# Altium PCB NC_PCB_4L.PcbDoc (part 1 of 2)
Units mm, origin at the board's own origin, x right, y up, seen from the top; angles counter-clockwise.
Board outline 25 x 37 mm, 4 copper layers (Top, GND, PWR, Bottom), stack 1.591 mm thick; 63 components, 32 nets, 228 pads, 73 vias.
Unrouted connection lines stored in the file: 49.
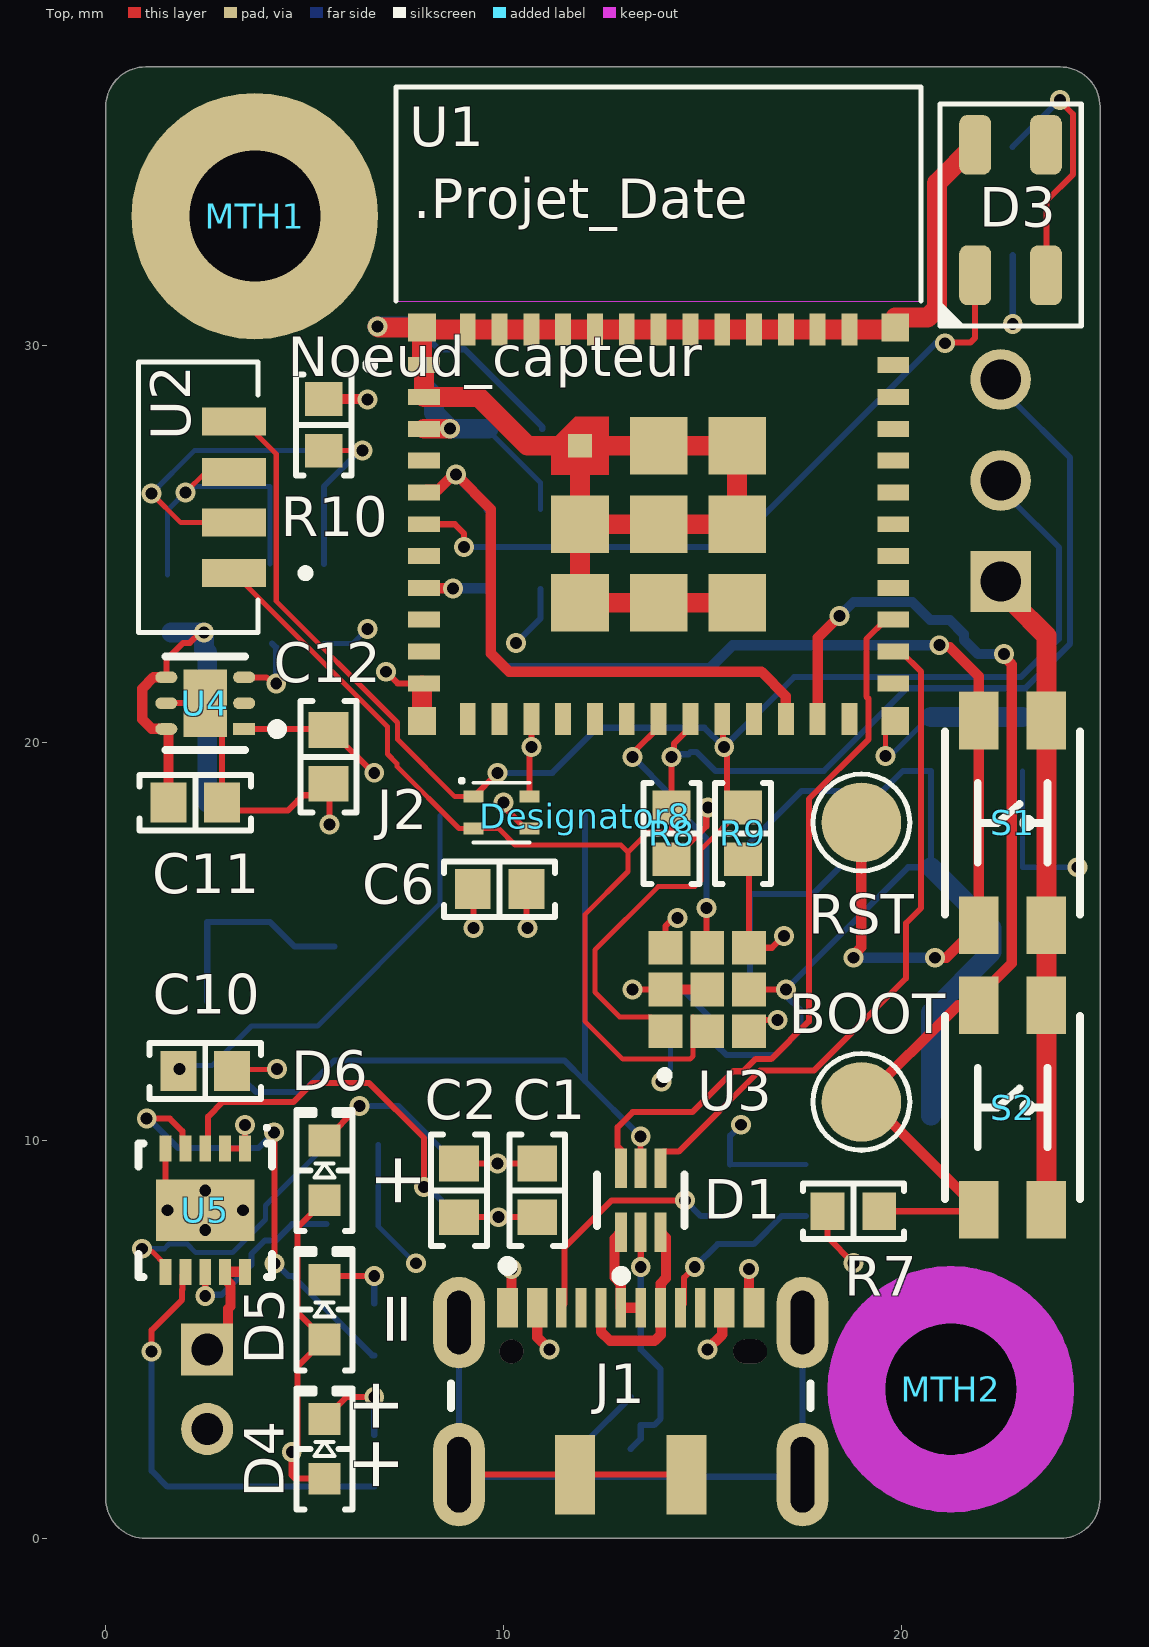
[diagram p0: Top view]
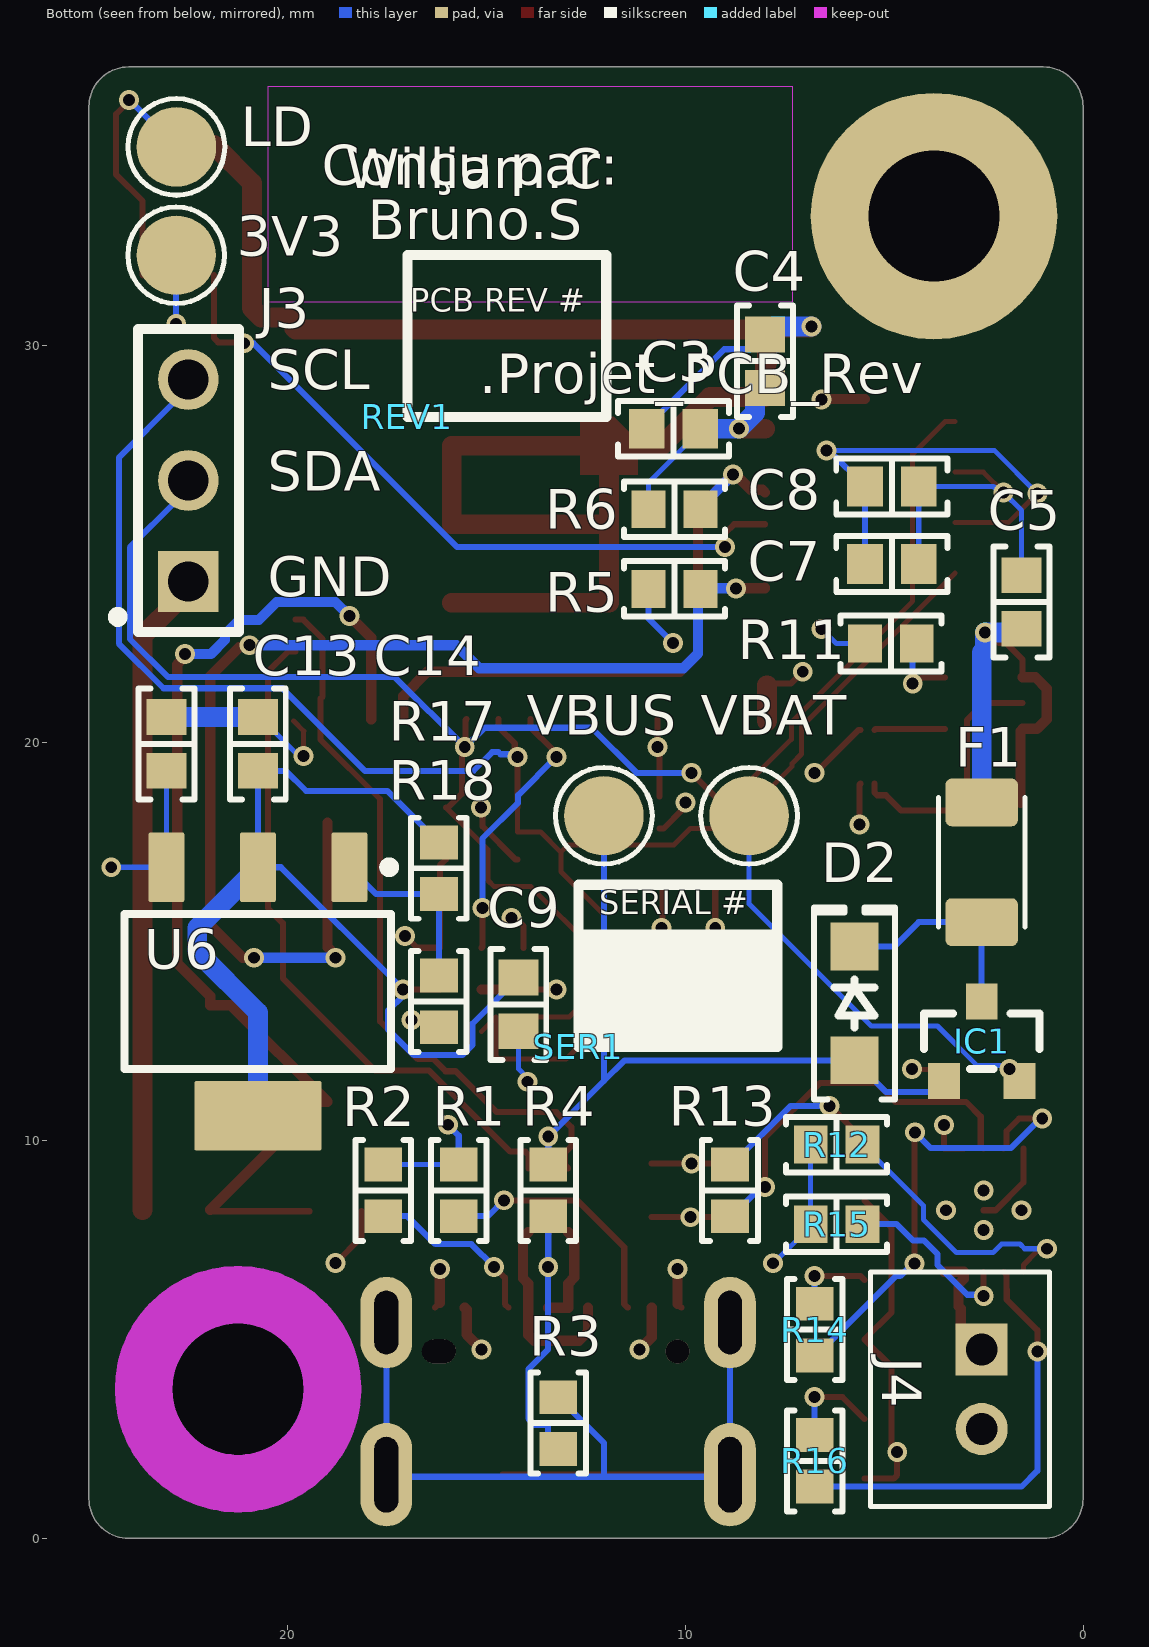
[diagram p1: Bottom view, seen from below]
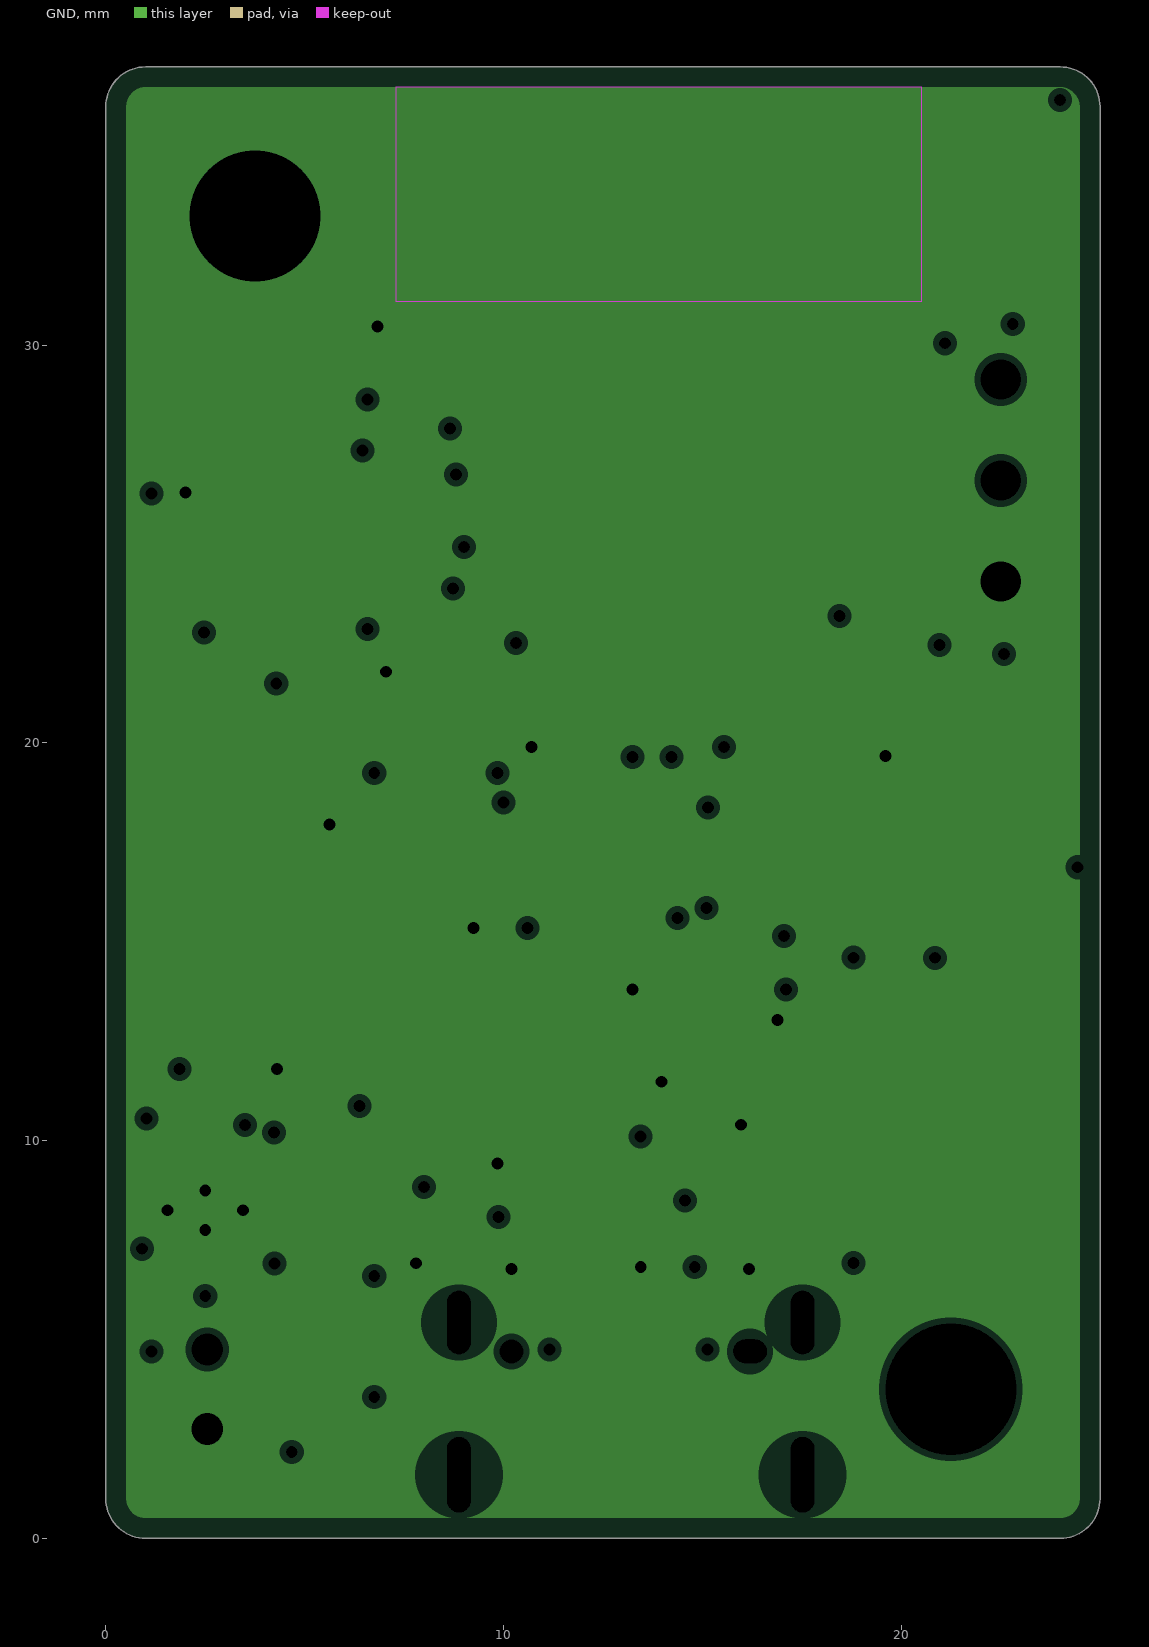
[diagram p2: GND, clearances drawn from the general rule]
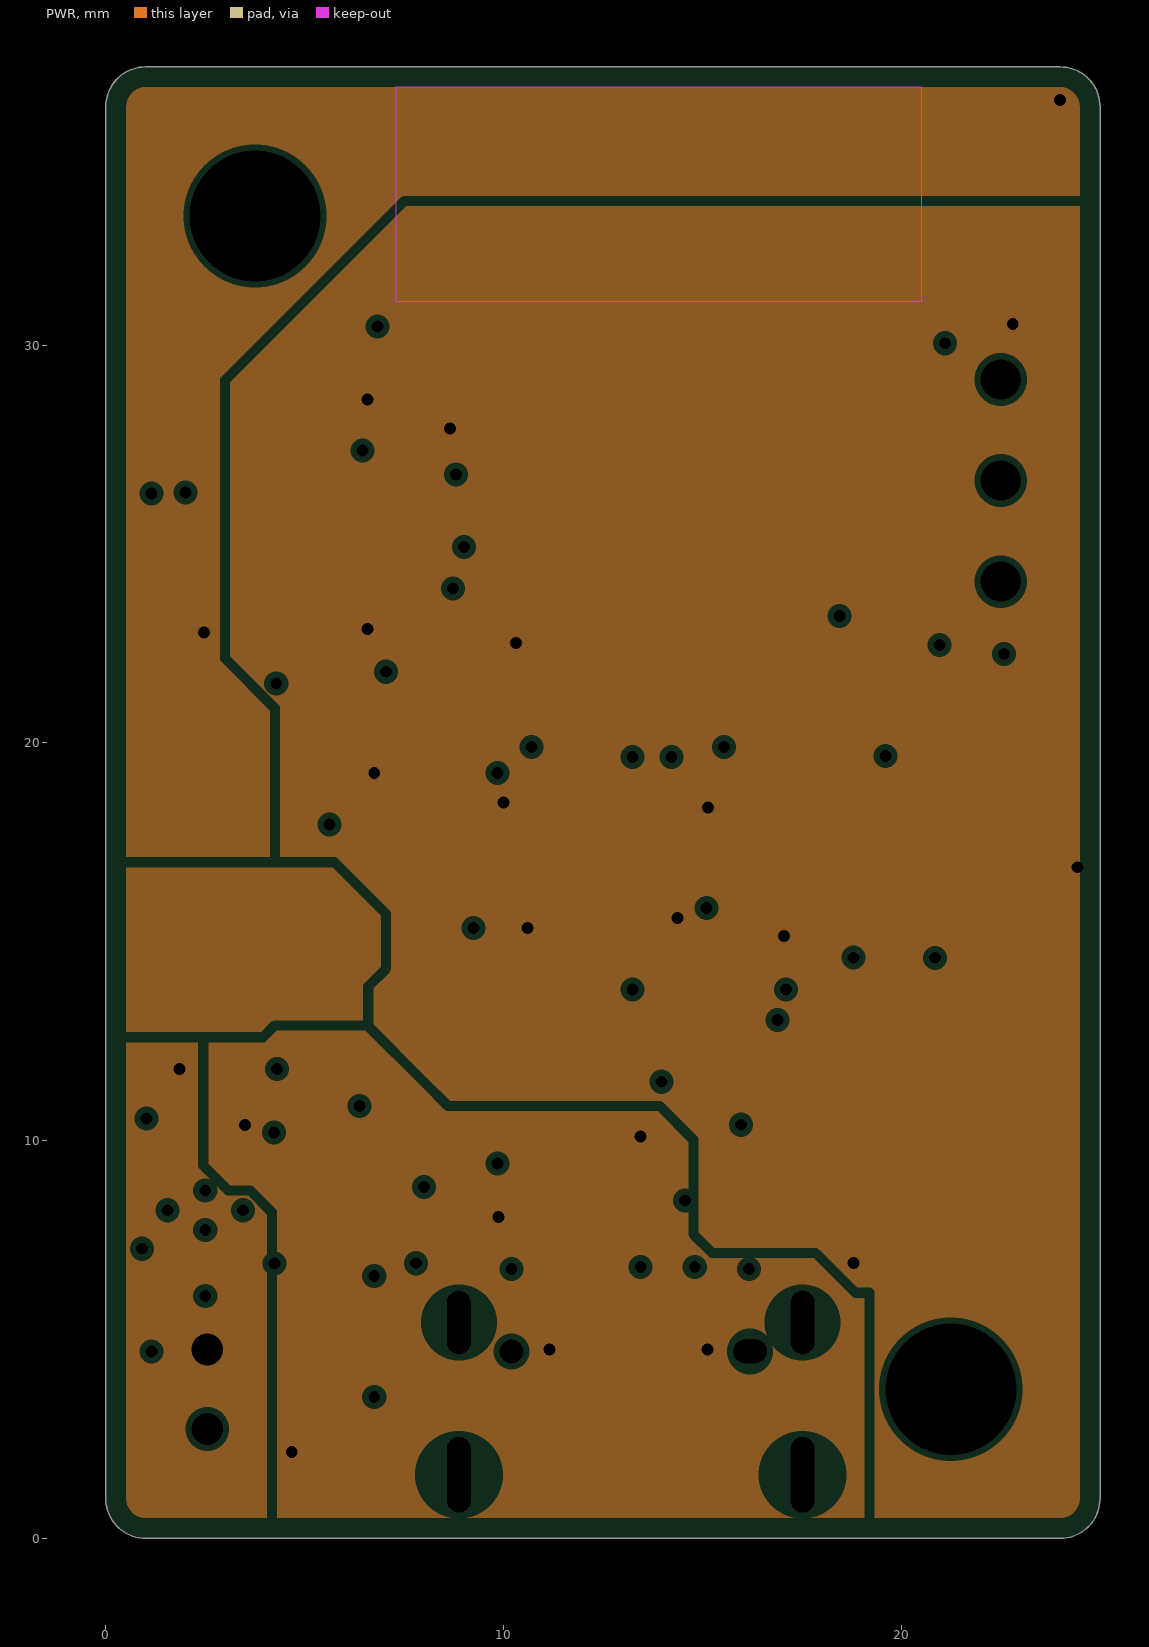
[diagram p3: PWR, clearances drawn from the general rule]
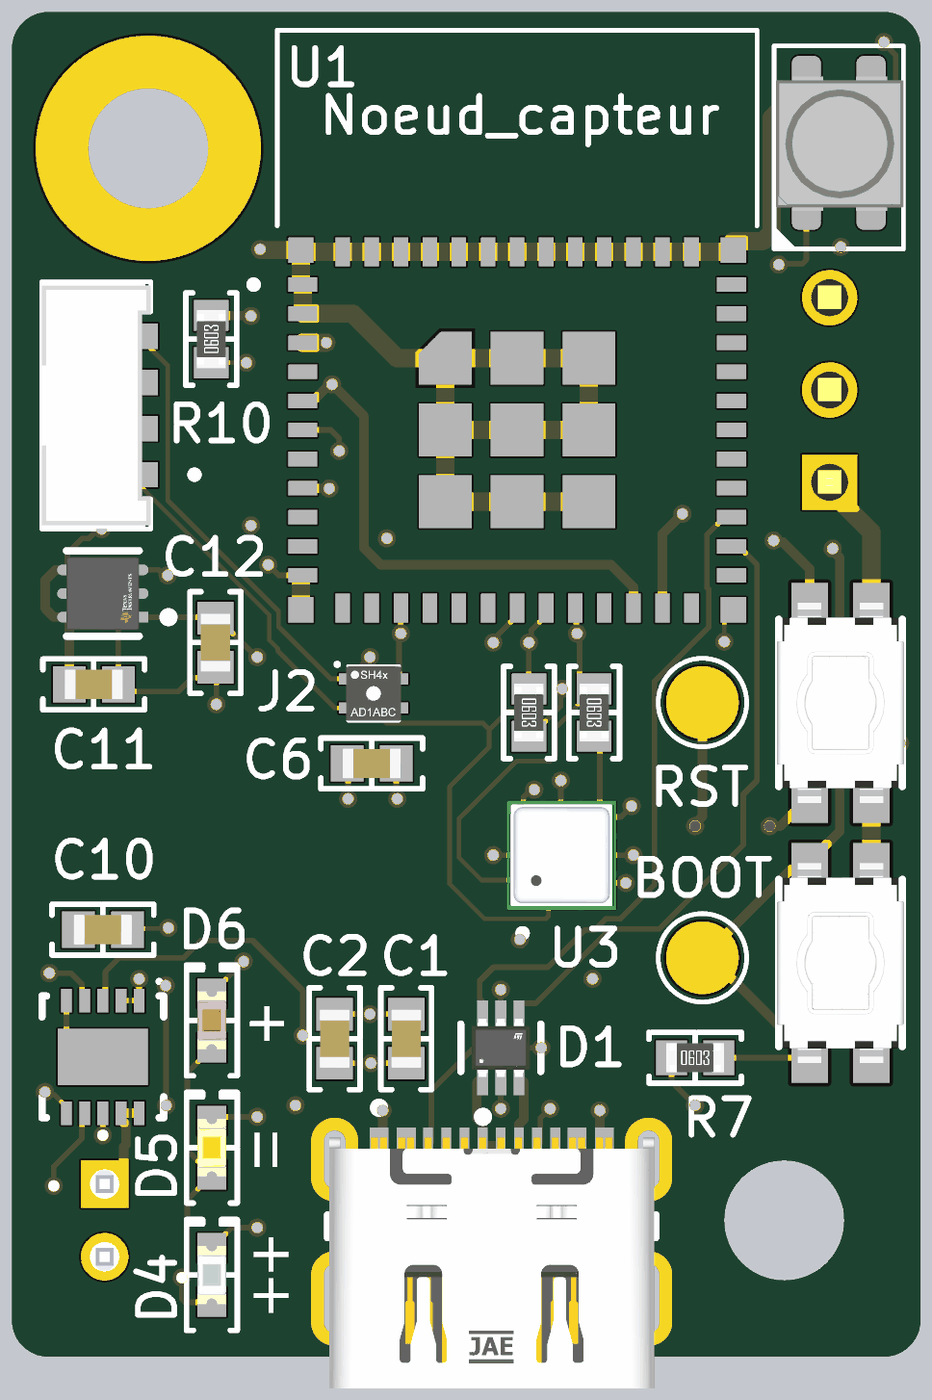
[diagram p4: 3D render of the assembled board from above, using the file's embedded part models]
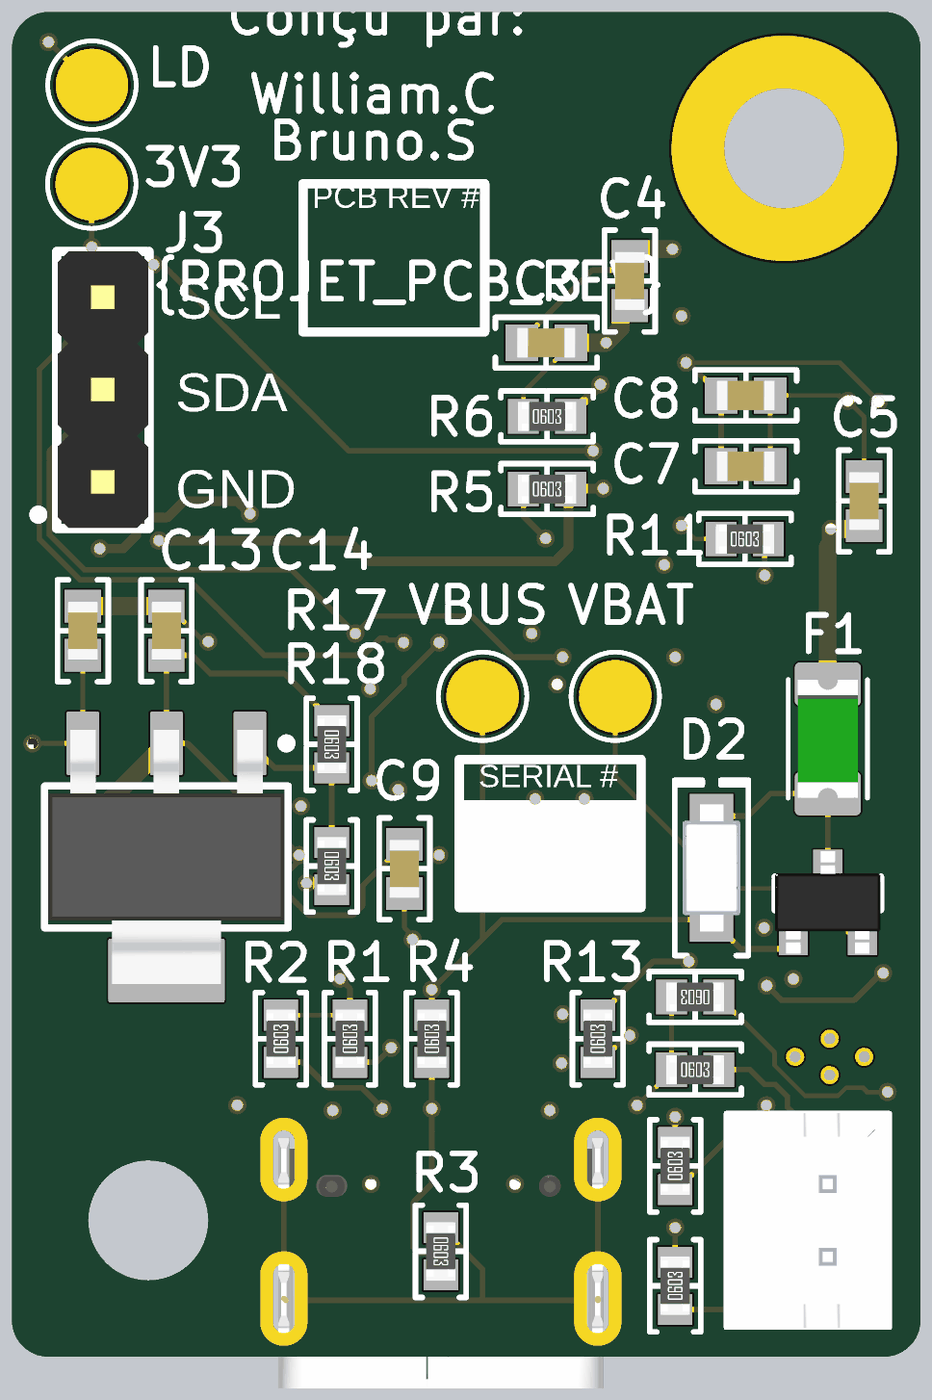
[diagram p5: 3D render of the assembled board from below, using the file's embedded part models]

## Layer stack, top to bottom
Top Solder: solder mask 0.0102, Solder Resist, Dk 3.5
Top: signal copper 0.035
Dielectric 1: prepreg 0.2104, 7628, Dk 4.1
GND: plane copper 0.0175, net GND
Dielectric 2: core 1.065, Dk 4.6
PWR: plane copper 0.0175, net (Multiple Nets)
Dielectric 3: prepreg 0.2104, 7628, Dk 4.6
Bottom: signal copper 0.035
Bottom Solder: solder mask 0.0102, Solder Resist, Dk 3.5

## Board outline
0,1 0,36 cw(c1,36) 1,37 24,37 cw(c24,36) 25,36 25,1 cw(c24,1) 24,0 1,0 cw(c1,1)

## Design rules (kind name [scope] priority, off if disabled: settings)
BoardOutlineClearance [All] p1: gap=0.2 ignorepadtopadclearanceinfootprint=FALSE except(0: Arc-SplitContinuation Track-SplitContinuation SMDPad-SplitContinuation THPad-SplitContinuation Via-SplitContinuation Fill-SplitContinuation Poly-SplitContinuation Region-SplitContinuation Text-SplitContinuation)
Clearance "Schematic Clearance Constraint_1" [InComponent('SER1')] p1: gap=0.254 ignorepadtopadclearanceinfootprint=FALSE except(0: Arc-Text Track-Text Text-Text)
Clearance "Schematic Clearance Constraint" [InComponent('REV1')] p2: gap=0.254 ignorepadtopadclearanceinfootprint=FALSE except(0: Arc-Text Track-Text Text-Text)
Clearance [All] p3: gap=0.152 ignorepadtopadclearanceinfootprint=FALSE except(0.127: Arc-Arc Arc-Track Arc-Hole Track-Track Track-Hole SMDPad-Fill SMDPad-Poly SMDPad-Region SMDPad-Hole THPad-Hole Via-Hole Fill-Hole Poly-Hole Region-Hole Text-Hole; 0.2: Arc-SMDPad Track-SMDPad; 0.254: Arc-Via Track-Via Via-Via; 0.33: Arc-THPad Track-THPad; 0.5: THPad-THPad)
ComponentClearance "Schematic Component Clearance Constraint_1" [InComponent('SER1')] p1: gap=0 collisioncheckmode=3 verticalgap=0 showdistances=FALSE
ComponentClearance "Schematic Component Clearance Constraint" [InComponent('REV1')] p2: gap=0 collisioncheckmode=3 verticalgap=0 showdistances=FALSE
ComponentClearance [All] p3: gap=0.102 collisioncheckmode=3 verticalgap=0.102 showdistances=FALSE
DiffPairsRouting [All] p1: maxlimit=0.254 minlimit=0.254 mostfreqgap=0.254 toplayer_minwidth=0.26 toplayer_maxwidth=0.381 toplayer_prefwidth=0.381 bottomlayer_minwidth=0.26 bottomlayer_maxwidth=0.381 bottomlayer_prefwidth=0.381 maxuncoupledlength=12.7
HoleSize [All] p1: absolutevalues=TRUE maxlimit=6.3 minlimit=0.3 maxpercent=80.000 minpercent=20.000
HoleToHoleClearance [All] p1: gap=0.45 allowstackedmicrovias=FALSE
MinimumAnnularRing [All] p1: minimumring=0.1
MinimumSolderMaskSliver [All] p1: minsoldermaskwidth=0.1
PlaneClearance [All] p1: clearance=0.152
PlaneConnect [All] p1: pad.planeconnectstyle=Relief pad.reliefexpansion=0.508 pad.reliefentries=4 pad.reliefconductorwidth=0.254 pad.reliefairgap=0.254 via.planeconnectstyle=Direct via.reliefexpansion=0.508 via.reliefentries=4 via.reliefconductorwidth=0.254 via.reliefairgap=0.254
PolygonConnect [All] p1: thpad.connectstyle=Relief thpad.reliefconductorwidth=0.254 thpad.reliefentries=4 thpad.polygonreliefangle="90 Angle" thpad.airgapwidth=0.254 smdpad.connectstyle=Relief smdpad.reliefconductorwidth=0.254 smdpad.reliefentries=4 smdpad.polygonreliefangle="90 Angle" smdpad.airgapwidth=0.254 via.connectstyle=Direct via.reliefconductorwidth=0.254 via.reliefentries=4 via.polygonreliefangle="90 Angle" via.airgapwidth=0.254
RoutingVias [All] p1: holewidth=0.3 width=0.5 viastyle="Through Hole" minholewidth=0.3 minwidth=0.5 maxholewidth=6.3 maxwidth=6.5
SilkToSilkClearance [All] p1: silktosilkclearance=0.102
SilkToSolderMaskClearance [IsPad] p1: minsilkscreentomaskgap=0.024 clearancetoexposedcopper=FALSE
SolderMaskExpansion SolderMaskExpansion_Via [isVia] p1: expansion=0.102 istentingtop=TRUE
SolderMaskExpansion [All] p2: expansion=0.051 istentingtop=FALSE
SupplyNets "Schematic Supply Nets_9" [InNet('VBAT')] p1: voltage=0.000
SupplyNets "Schematic Supply Nets_8" [InNet('3V3')] p2: voltage=0.000
SupplyNets "Schematic Supply Nets_7" [InNet('VBUS')] p3: voltage=0.000
SupplyNets "Schematic Supply Nets_6" [InNet('GND')] p4: voltage=0.000
SupplyNets "Schematic Supply Nets_2" [InNet('LOAD')] p5: voltage=0.000
SupplyNets "Schematic Supply Nets" [InNet('1V8')] p6: voltage=0.000
Width [All] p1: maxlimit=25.4 minlimit=0.127 preferedwidth=0.152 minimp=50.000000 maximp=50.000000 favimp=50.000000
21 further rules are at their usual default settings.

## Classes and differential pairs
component class NC_Connectors: C1 C2 C? D1 D2 F1 IC1 J1 MTH1 MTH2 R1 R2 R3 R4 R? VBUS
component class NC_Circuit: BOOT C3 C4 C5 C6 C7 C8 C9 C? D3 J2 J3 R5 R6 R7 R8 R9 R10 R? RST S1 S2 S? U1 U2 U3
component class NC_Alimentation: 3V3 C10 C11 C12 C13 C14 C? D4 D5 D6 g J4 LOAD R11 R12 R13 R14 R15 R16 R17 R18 R? U4 U6 VBAT
component class NC_Title: REV1 SER1

## Components (designator, comment, footprint, x,y, rotation, side; value= is the part's Value field where it differs from the comment)
3V3 "TPO_SMD_ROUND_2MM" TPO_SMD_ROUND_2MM 22.805,32.264 r180 bottom (schematic designator TP6)
BOOT "TPO_SMD_ROUND_2MM" TPO_SMD_ROUND_2MM 19,10.975 r0 top (schematic designator TP4)
C1 "1µF" "CAP 0603_1608" 10.85,8.75 r270 top
C2 "1µF" "CAP 0603_1608" 8.88,8.75 r270 top
C3 "10 µF" "CAP 0603_1608" 10.3,27.9 r180 bottom
C4 "0.1 µF" "CAP 0603_1608" 8,29.6 r270 bottom
C5 "1µF" "CAP 0603_1608" 1.55,23.545 r270 bottom
C6 "1µF" "CAP 0603_1608" 9.9,16.325 r0 top
C7 "1µF" "CAP 0603_1608" 4.808,24.5 r0 bottom
C8 "1µF" "CAP 0603_1608" 4.808,26.45 r0 bottom
C9 "1µF" "CAP 0603_1608" 14.2,13.425 r90 bottom
C10 "10 µF" "CAP 0603_1608" 2.5,11.75 r180 top
C11 "1 µF" "CAP 0603_1608" 2.25,18.5 r180 top
C12 "1 µF" "CAP 0603_1608" 5.6,19.65 r90 top
C13 "0.1 µF" "CAP 0603_1608" 23.05,19.975 r270 bottom
C14 "10 µF" "CAP 0603_1608" 20.75,19.975 r270 bottom
D1 "USBLC6-2P6" FP-SOT-666-MFG 13.45,8.5 r90 top
D2 "MBR1H100SFT3G" SOD123F 5.75,13.45 r90 bottom
D3 "Neopixel_3535" Neopixel_3535-Footprint-1 22.75,33.401 r270 top
D4 "Green" "LED 0603_1608 GREEN" 5.5,2.25 r90 top
D5 "Yellow" "LED 0603_1608 YELLOW" 5.5,5.75 r90 top
D6 "Red" "LED 0603_1608 RED" 5.5,9.25 r90 top
Designator8 "Comment" STN_STENCIL_TOP_LPKFS4_210x297 12.05,18.17 r0 top
F1 "PTC_1.8A_1206" RESC3216X125N 2.55,17 r270 bottom
IC1 "DMG3415U-7" "DIODES SOT-23-3" 2.55,12.5 r90 bottom
J1 "DX07S016JA1R1500" FP-DX07S016JA1R1500-MFG 13.2,2.6 r0 top
J2 "SHT41-AD1B-R2" SHT4X 9.95,18.25 r0 top
J3 "CON_HDR_1X3" CON_HDR_1x3 22.5,26.6 r0 bottom
J4 "B2B-PH-K-S" JST_B2B-PH-K-S 3.1,3.75 r90 bottom
LD "TPO_SMD_ROUND_2MM" TPO_SMD_ROUND_2MM 22.8,34.989 r180 bottom (schematic designator TP5)
MTH1 "MTH_M3" MTH_M3 3.75,33.25 r0 top
MTH2 "MTH_M3_NON_PLATED" MTH_M3_NON_PLATED 21.25,3.75 r0 top
R1 "5.1k Ohms" "RES 0603_1608" 15.7,8.75 r90 bottom
R2 "5.1k Ohms" "RES 0603_1608" 17.6,8.75 r90 bottom
R3 "0 Ohms" "RES 0603_1608" 13.2,2.9 r270 bottom
R4 "100K Ohms" "RES 0603_1608" 13.45,8.75 r90 bottom
R5 "10k Ohms" "RES 0603_1608" 10.275,23.875 r180 bottom
R6 "10k Ohms" "RES 0603_1608" 10.275,25.875 r180 bottom
R7 "10k Ohms" "RES 0603_1608" 18.8,8.225 r0 top
R8 "4.7K Ohms" "RES 0603_1608" 14.225,17.725 r270 top
R9 "4.7K Ohms" "RES 0603_1608" 16.022,17.725 r270 top
R10 "10 Ohms" "RES 0603_1608" 5.483,28 r90 top
R11 "10k Ohms" "RES 0603_1608" 4.833,22.5 r180 bottom
R12 "1k Ohms" "RES 0603_1608" 6.2,9.9 r0 bottom
R13 "470 Ohms" "RES 0603_1608" 8.88,8.75 r90 bottom
R14 "470 Ohms" "RES 0603_1608" 6.75,5.25 r90 bottom
R15 "10k Ohms" "RES 0603_1608" 6.2,7.9 r180 bottom
R16 "470 Ohms" "RES 0603_1608" 6.75,1.95 r90 bottom
R17 "150 Ohms" "RES 0603_1608" 16.2,16.85 r270 bottom
R18 "75 Ohms" "RES 0603_1608" 16.2,13.5 r270 bottom
REV1 "Revision Cartridge Mini" REV_REVISION_CARTRIDGE_MINI 16.991,28.2 r180 bottom
RST "TPO_SMD_ROUND_2MM" TPO_SMD_ROUND_2MM 19,18 r0 top (schematic designator TP3)
S1 "EVQ-P2202M" "PANASONIC EVQP2" 22.8,17.99 r270 top
S2 "EVQ-P2202M" "PANASONIC EVQP2" 22.8,10.834 r270 top
SER1 "Serial Cartridge MICRO" SER_SERIAL_CARTRIDGE_MICRO 12.692,12.359 r180 bottom
U1 "ESP32-C3-MINI-1-N4" XCVR_ESP32-C3-MINI-1-N4 13.9,28.2 r0 top
U2 "VEML7700-TT" XDCR_VEML7700-TT 2.322,26.175 r180 top
U3 "ENS160-BGLM" XDCR_ENS160-BGLM 15.125,13.8 r90 top
U4 "LP5912-3.3DRVT" FP-DRV0006A-IPC_C 2.5,21 r180 top
U5 "MCP73833T-FCI/MF" DFN-MF10 2.5,8.25 r270 top
U6 "LM1117MPX-ADJ/NOPB" DCY0004A_N 20.75,13.75 r270 bottom
VBAT "TPO_SMD_ROUND_2MM" TPO_SMD_ROUND_2MM 8.4,18.17 r180 bottom (schematic designator TP9)
VBUS "TPO_SMD_ROUND_2MM" TPO_SMD_ROUND_2MM 12.05,18.17 r180 bottom (schematic designator TP1)

## Footprints (in the part's own frame and the unit in brackets; to place one, negate y for a bottom-side part, rotate by r counter-clockwise, add the part's x,y. Pads: shape width x height; smd on the part's side, far side on the other; paste and mask are expansions set on the pad)
"CAP 0603_1608" [mm] "Chip Capacitor, 2-Leads, Body 1.60x0.80mm, IPC Medium Density"
  rect 0.9x1 smd: 1(-0.675,0) 2(0.675,0)
  silkscreen extent -1.4,-0.7 1.4,0.7, body extent -0.8,-0.41 0.8,0.41, height 0.82
CON_HDR_1x3 [mil]
  rect 60x60 hole 40: 1(0,100)
  round 60 hole 40: 2(0,0) 3(0,-100)
  silkscreen extent -50,-150 75,150, body extent -49,-150 49,150, height 338
DCY0004A_N [mm] "SOT223, 4-Leads, Body 6.7x3.7mm, Pitch 2.3mm, IPC Medium Density"
  rrect11% 1.75x0.9 smd: 1(-3.125,2.3) 2(-3.125,0) 3(-3.125,-2.3)
  rrect6% 1.75x3.2 smd: 4(3.125,0)
  silkscreen extent -3.25,-3.35 1.95,3.42, body extent -3.5,-3.25 3.5,3.25, height 1.62
DFN-MF10 [mm] "SON, 10-Leads, Body 3x3mm, Pitch 0.5mm, Microchip Recommended"
  rect 0.65x0.3 smd: 1(-1.55,1) 2(-1.55,0.5) 3(-1.55,0) 4(-1.55,-0.5) 5(-1.55,-1) 6(1.55,-1) 7(1.55,-0.5) 8(1.55,0) 9(1.55,0.5) 10(1.55,1)
  rect 1.55x2.48 smd: 11(0,0)
  silkscreen extent -2.12,-1.68 1.68,1.68, body extent -1.52,-1.52 1.52,1.52, height 1
"DIODES SOT-23-3" [mm] "SOT23, 3-Leads, Body 2.90x2.40mm, Pitch 0.95mm, IPC Medium Density"
  rect 0.9x0.8 smd: 1(-1,0.95) 2(-1,-0.95) 3(1,0)
  silkscreen extent -0.7,-1.45 0.7,1.45, body extent -1.41,-1.45 1.41,1.45, height 1.5
FP-DRV0006A-IPC_C [mm]
  rect 0.556x0.292 smd paste+0 mask+0: 1(-0.978,0.65)
  rrect100% 0.556x0.292 smd paste+0 mask+0: 2(-0.978,0) 3(-0.978,-0.65) 4(0.978,-0.65) 5(0.978,0) 6(0.978,0.65)
  rect 1.1x1.7 smd paste-1000 mask+0: 7(0,0)
  silkscreen extent -1.93,-1.18 1,1.18, body extent -1,-1 1,1, height 0.8
FP-DX07S016JA1R1500-MFG [mm]
  rrect100% 1.3x2.3 hole 1.6 slot 0.6 at 0 deg paste-2539.97 mask+0: 1(-4.32,2.825) 2(4.32,2.825)
  rrect100% 1.3x2.6 hole 1.9 slot 0.6 at 0 deg paste-2539.97 mask+0: 3(-4.32,-1) 6(4.32,-1)
  rect 1x2 smd paste+0 mask+0: 4(-1.4,-1) 5(1.4,-1)
  rect 0.52x1 smd paste+0 mask+0: A1/B12(-3.1,3.2) A4/B9(-2.35,3.2) A12/B1(3.1,3.2) B4/A9(2.35,3.2)
  rect 0.27x1 smd paste+0 mask+0: A5(-1.75,3.2) A6(-0.25,3.2) A7(0.75,3.2) A8(1.75,3.2) B5(1.25,3.2) B6(0.25,3.2) B7(-0.75,3.2) B8(-1.25,3.2)
  round 0.6 hole 0.6 unplated paste-2539.97 mask+0: ""(-3,2.1)
  rrect100% 0.85x0.6 hole 0.6 slot 0.85 at 0 deg unplated paste-2539.97 mask+0: ""(3,2.1)
  silkscreen extent -4.52,0.68 4.52,4.37, body extent -5.07,-3.75 5.07,4.08, height 0.25
FP-SOT-666-MFG [mm]
  rect 0.99x0.3 smd paste+0 mask+0: 1(-0.805,0.5) 2(-0.805,0) 3(-0.805,-0.5) 4(0.805,-0.5) 5(0.805,0) 6(0.805,0.5)
  silkscreen extent -2.02,-1.1 0.65,1.1, body extent -1.4,-0.95 1.4,0.95, height 0.25
JST_B2B-PH-K-S [mm]
  rect 1.308x1.308 / inner round 1.308 / far side rect 1.308x1.308 hole 0.8: 1(1,-0.55)
  round 1.308 hole 0.8: 2(-1,-0.55)
  silkscreen extent -2.95,-2.25 2.95,2.25, body extent -2.95,-2.25 2.95,2.25, height 6
"LED 0603_1608 GREEN" [mm] "Chip Diode, 2-Leads, Body 1.60x0.80mm, IPC Medium Density"
  rect 0.8x0.8 smd: 1(-0.75,0) 2(0.75,0)
  silkscreen extent -1.52,-0.7 1.52,0.7, body extent -0.8,-0.4 0.8,0.4, height 0.53
"LED 0603_1608 RED" [mm] "Chip Diode, 2-Leads, Body 1.60x0.80mm, IPC Medium Density"
  rect 0.8x0.8 smd: 1(-0.75,0) 2(0.75,0)
  silkscreen extent -1.52,-0.7 1.52,0.7, body extent -0.8,-0.4 0.8,0.4, height 0.53
"LED 0603_1608 YELLOW" [mm] "Chip Diode, 2-Leads, Body 1.60x0.80mm, IPC Medium Density"
  rect 0.8x0.8 smd: 1(-0.75,0) 2(0.75,0)
  silkscreen extent -1.52,-0.7 1.52,0.7, body extent -0.8,-0.4 0.8,0.4, height 0.53
MTH_M3 [mm] "Mounting Hole Metric M3"
  round 6.2 hole 3.3 paste-2539.97 mask+0.07: 1(0,0)
MTH_M3_NON_PLATED [mm] "Mounting Hole Metric M3 NON_PLATED"
  round 0 hole 3.3 unplated paste-2539.97 mask+0.07: 1(0,0)
  Top keep-out circle w1.45: c0,0 r2.375
  Bottom keep-out circle w1.45: c0,0 r2.375
Neopixel_3535-Footprint-1 [mm]
  rrect50% 1.5x0.8 smd: 1(-1.64,0.89) 2(-1.64,-0.89) 3(1.64,-0.89) 4(1.64,0.89)
  silkscreen extent -2.67,-1.78 2.92,1.78, body extent -1.82,-1.72 1.88,1.78, height 0.95
"PANASONIC EVQP2" [mm] "T-Switch. 4-leads, body 4.7x3.5mm, Panasonic EVQ-P2202M"
  rect 1.45x1 smd mask+0.1: 1(-2.575,0.85) 2(2.575,0.85) 3(-2.575,-0.85) 4(2.575,-0.85)
  silkscreen extent -2.3,-1.7 2.3,1.7, body extent -2.75,-1.75 2.75,1.75, height 2.1
"RES 0603_1608" [mm] "Chip Resistor, 2-Leads, Body 1.60x0.80mm, IPC Medium Density"
  rect 0.85x0.95 smd: 1(-0.65,0) 2(0.65,0)
  silkscreen extent -1.27,-0.7 1.27,0.7, body extent -0.8,-0.4 0.8,0.4, height 0.45
RESC3216X125N [mm]
  rrect25% 1.2x1.82 smd: 1(-1.505,0) 2(1.505,0)
  silkscreen extent -1.63,-1.09 1.63,1.09, body extent -1.63,-0.82 1.63,0.82, height 0.86
REV_REVISION_CARTRIDGE_MINI [mm]
  silkscreen extent 0,0 5,4.08
SER_SERIAL_CARTRIDGE_MICRO [mm]
  silkscreen extent 0,0 5.02,4.08
SHT4X [mm]
  rect 0.5x0.3 smd: 1(-0.7,0.4) 2(-0.7,-0.4) 3(0.7,-0.4) 4(0.7,0.4)
  silkscreen extent -1.05,-0.75 0.7,0.85, body extent -0.75,-0.75 0.75,0.75, height 0.69
SOD123F [mm] "SODFL, 2-Leads, Body 1.60x3.50mm, IPC Medium Density"
  rect 1.2x1.2 smd: 1(-1.43,0) 2(1.43,0)
  silkscreen extent -2.41,-1.02 2.41,1.02, body extent -1.75,-0.8 1.75,0.8, height 1.1
STN_STENCIL_TOP_LPKFS4_210x297 [mm] "Paste Mask Stencil TOP - PROTOPRINT S4 210x297"
  body extent -110.84,-153.45 -108.84,-151.45
TPO_SMD_ROUND_2MM [mm] "Test Point - SMD ROUND PAD ONLY"
  round 2 smd paste-2 mask+0.07: 1(0,0)
  silkscreen extent -1.22,-1.22 1.22,1.22, body extent -0.9,-0.9 0.9,0.9
XCVR_ESP32-C3-MINI-1-N4 [mm]
  rect 0.8x0.4 smd: 1(-5.9,1.3) 2(-5.9,0.5) 3(-5.9,-0.3) 4(-5.9,-1.1) 5(-5.9,-1.9) 6(-5.9,-2.7) 7(-5.9,-3.5) 8(-5.9,-4.3) 9(-5.9,-5.1) 10(-5.9,-5.9) 11(-5.9,-6.7) 25(5.9,-6.7) 26(5.9,-5.9) 27(5.9,-5.1) 28(5.9,-4.3) 29(5.9,-3.5) 30(5.9,-2.7) 31(5.9,-1.9) 32(5.9,-1.1) 33(5.9,-0.3) 34(5.9,0.5) 35(5.9,1.3)
  rect 0.4x0.8 smd: 12(-4.8,-7.6) 13(-4,-7.6) 14(-3.2,-7.6) 15(-2.4,-7.6) 16(-1.6,-7.6) 17(-0.8,-7.6) 18(0,-7.6) 19(0.8,-7.6) 20(1.6,-7.6) 21(2.4,-7.6) 22(3.2,-7.6) 23(4,-7.6) 24(4.8,-7.6) 36(4.8,2.2) 37(4,2.2) 38(3.2,2.2) 39(2.4,2.2) 40(1.6,2.2) 41(0.8,2.2) 42(0,2.2) 43(-0.8,2.2) 44(-1.6,2.2) 45(-2.4,2.2) 46(-3.2,2.2) 47(-4,2.2) 48(-4.8,2.2)
  rect 0.6x0.6 smd paste-1 mask+0: 49_1(-1.975,-0.725)
  rect 1.45x1.45 smd: 49_2(0,-0.725) 49_3(1.975,-0.725) 49_4(1.975,-2.7) 49_5(1.975,-4.675) 49_6(0,-4.675) 49_7(-1.975,-4.675) 49_8(-1.975,-2.7) 49_9(0,-2.7)
  rect 0.7x0.7 smd: 50(5.95,2.25) 51(5.95,-7.65) 52(-5.95,-7.65) 53(-5.95,2.25)
  Top region: -1.25,-1.45 -2.7,-1.45 -2.7,-0.6 -2.1,0 -1.25,0
  Keep-Out Layer region: 6.6,2.9 -6.6,2.9 -6.6,8.3 6.6,8.3
  Keep-Out Layer region: 6.6,2.9 -6.6,2.9 -6.6,8.3 6.6,8.3
  silkscreen extent -7.35,1.2 6.6,8.3
XDCR_ENS160-BGLM [mm]
  rect 0.85x0.85 smd mask+0.05: 1(-1.05,1.05) 2(-1.05,0) 3(-1.05,-1.05) 4(0,-1.05) 5(1.05,-1.05) 6(1.05,0) 7(1.05,1.05) 8(0,1.05) 9(0,0)
  silkscreen extent -2.25,0.97 -2.05,1.17, body extent -1.5,-1.5 1.5,1.5, height 0.9
XDCR_VEML7700-TT [mm]
  rect 1.6x0.7 smd: 1(-0.9,1.905) 2(-0.9,0.635) 3(-0.9,-0.635) 4(-0.9,-1.905)
  silkscreen extent -2.8,-3.4 1.5,3.4, body extent -1.5,-3.4 1.5,3.4, height 1.35

## Part data
3V3 BOOT LD RST VBAT VBUS: library part CMP-007-000003-1, "TPO - TEST POINT ROUND SMD PAD ONLY  - 2 MM", Package="2 MM ROUND", Assembly Type=NONE, Component Type="Standard (No BOM)", Design Item ID=TPO_SMD_ROUND_2MM, Pin Count=1, Source=CEGEP_SHERBROOKE_TGE_LIBRARY.SchLib
C1 C5 C8 C9: library part 06035C105KAT2A, "CAP CER 1UF 50V X7R 0603", Capacitance=10µF, Device Package="0603 (1608 Metric)", manufacturer="AVX Corporation", Operating Temperature="-55°C ~ 125°C", Supplier Part Number 1=478-10073-1-ND, Temperature Coefficient=X7R, Tolerance=±10%, Voltage - Rated=50V, Applications="General Purpose", componentlink1description=Datasheet, componentlink1url=http://datasheets.avx.com/X7RDielectric.pdf, componentlink2description="DigiKey Link", componentlink2url=http://digikey.com/product-detail/en/avx-corporation/06035C105KAT2A/478-10073-1-ND/6564295, lastupdated="2020-09-02 1:03:35 AM", Lifecycle Status=Active, Minimum Order=1, Mounting Type="Surface Mount, MLCC", Package / Case="0603 (1608 Metric)", packaging=TapeAndReel, Part Number=06035C105KAT2A, Part Status=Active, partid=2905, price=0.15, series=-, Size / Dimension="0.063\" L x 0.032\" W (1.60mm x 0.81mm)", Supplier 1=DigiKey, Thickness (Max)="0.020\" (0.50mm)"
C2: library part 06035C105KAT2A, "CAP CER 1UF 50V X7R 0603", Device Package="0603 (1608 Metric)", manufacturer="AVX Corporation", Operating Temperature="-55°C ~ 125°C", Supplier Part Number 1=478-10073-1-ND, Temperature Coefficient=X7R, Tolerance=±10%, Voltage - Rated=50V, Applications="General Purpose", Capacitance=1µF, componentlink1description=Datasheet, componentlink1url=http://datasheets.avx.com/X7RDielectric.pdf, componentlink2description="DigiKey Link", componentlink2url=http://digikey.com/product-detail/en/avx-corporation/06035C105KAT2A/478-10073-1-ND/6564295, lastupdated="2020-09-02 1:03:35 AM", Lifecycle Status=Active, Minimum Order=1, Mounting Type="Surface Mount, MLCC", Package / Case="0603 (1608 Metric)", packaging=TapeAndReel, Part Number=06035C105KAT2A, Part Status=Active, partid=2905, price=0.15, series=-, Size / Dimension="0.063\" L x 0.032\" W (1.60mm x 0.81mm)", Supplier 1=DigiKey, Thickness (Max)="0.020\" (0.50mm)"
C3: library part GRM188R60J106ME47D, "CAP CER 10UF 6.3V X5R 0603", Device Package=0603, manufacturer="Murata Electronics", Operating Temperature="-55°C ~ 85°C", Package / Case="0603 (1608 Metric)", Supplier Part Number 1=490-3896-1-ND, Temperature Coefficient=X5R, Tolerance=±20%, Voltage - Rated=6.3V, Applications="General Purpose", Capacitance="10 µF", componentlink1description=Datasheet, componentlink1url=https://www.murata.com/~/media/webrenewal/support/library/catalog/products/capacitor/mlcc/c02e.ashx?la=en-us, componentlink2description="DigiKey Link", componentlink2url=https://www.digikey.com/en/products/detail/murata-electronics/GRM188R60J106ME47D/965910, lastupdated="06/04/2026 19:23:52", Lifecycle Status=Active, Minimum Order=1, Mounting Type="Surface Mount, MLCC", packaging=TapeAndReel, Part Number=GRM188R60J106ME47D, Part Status=Active, partid=2351, price=0.01, series=GRM, Size / Dimension="0.063\" L x 0.031\" W (1.60mm x 0.80mm)", Supplier 1=DigiKey, Thickness (Max)="0.035\" (0.90mm)"
C4: library part 6R3X14W104MV4T, "CAP CER 0.1UF 6.3V X7R 0603", Device Package="0603 (1608 Metric)", manufacturer="Johanson Dielectrics Inc.", Operating Temperature="-55°C ~ 125°C", Supplier Part Number 1=709-1009-1-ND, Temperature Coefficient=X7R, Tolerance=±20%, Voltage - Rated=6.3V, Applications="Bypass, Decoupling", Capacitance="0.1 µF", componentlink1description=Datasheet, componentlink1url=https://www.johansondielectrics.com/downloads/x2y-filter-and-decoupling-capacitors.pdf, componentlink2description="DigiKey Link", componentlink2url=https://www.digikey.com/en/products/detail/johanson-dielectrics-inc/6R3X14W104MV4T/1556331, Features="Low ESL (X2Y)", lastupdated="06/04/2026 19:23:51", Lifecycle Status=Active, Minimum Order=1, Mounting Type="Surface Mount, MLCC", Package / Case="0603 (1608 Metric)", packaging=TapeAndReel, Part Number=6R3X14W104MV4T, Part Status=Active, partid=2650, price=0.08, series=X2Y®, Size / Dimension="0.064\" L x 0.035\" W (1.63mm x 0.89mm)", Supplier 1=DigiKey, Thickness (Max)="0.026\" (0.66mm)"
C6 C7: library part 06035C105KAT2A, "CAP CER 1UF 50V X7R 0603", Capacitance=100nF, Device Package="0603 (1608 Metric)", manufacturer="AVX Corporation", Operating Temperature="-55°C ~ 125°C", Supplier Part Number 1=478-10073-1-ND, Temperature Coefficient=X7R, Tolerance=±10%, Voltage - Rated=50V, Applications="General Purpose", componentlink1description=Datasheet, componentlink1url=http://datasheets.avx.com/X7RDielectric.pdf, componentlink2description="DigiKey Link", componentlink2url=http://digikey.com/product-detail/en/avx-corporation/06035C105KAT2A/478-10073-1-ND/6564295, lastupdated="2020-09-02 1:03:35 AM", Lifecycle Status=Active, Minimum Order=1, Mounting Type="Surface Mount, MLCC", Package / Case="0603 (1608 Metric)", packaging=TapeAndReel, Part Number=06035C105KAT2A, Part Status=Active, partid=2905, price=0.15, series=-, Size / Dimension="0.063\" L x 0.032\" W (1.60mm x 0.81mm)", Supplier 1=DigiKey, Thickness (Max)="0.020\" (0.50mm)"
C10 C14: library part GRM188R60J106ME47D, "CAP CER 10UF 6.3V X5R 0603", Device Package="0603 (1608 Metric)", manufacturer="Murata Electronics", Operating Temperature="-55°C ~ 85°C", Supplier Part Number 1=490-3896-1-ND, Temperature Coefficient=X5R, Tolerance=±20%, Voltage - Rated=6.3V, Applications="General Purpose", Capacitance="10 µF", componentlink1description=Datasheet, componentlink1url=https://www.murata.com/~/media/webrenewal/support/library/catalog/products/capacitor/mlcc/c02e.ashx?la=en-us, componentlink2description="DigiKey Link", componentlink2url=https://www.digikey.com/en/products/detail/murata-electronics/GRM188R60J106ME47D/965910, lastupdated="06/04/2026 19:23:52", Lifecycle Status=Active, Minimum Order=1, Mounting Type="Surface Mount, MLCC", Package / Case="0603 (1608 Metric)", packaging=TapeAndReel, Part Number=GRM188R60J106ME47D, Part Status=Active, partid=2351, price=0.01, series=GRM, Size / Dimension="0.063\" L x 0.031\" W (1.60mm x 0.80mm)", Supplier 1=DigiKey, Thickness (Max)="0.035\" (0.90mm)"
C11: library part C0603C105K4RACAUTO, "CAP CER 1UF 16V X7R 0603", Device Package=0603, manufacturer=KEMET, Operating Temperature="-55°C ~ 125°C", Package / Case="0603 (1608 Metric)", Ratings=AEC-Q200, Supplier Part Number 1=399-17704-1-ND, Temperature Coefficient=X7R, Tolerance=±10%, Voltage - Rated=16V, Applications="Automotive, Bypass, Decoupling", Capacitance="1 µF", componentlink1description=Datasheet, componentlink1url=https://api.kemet.com/component-edge/download/datasheet/C0603C105K4RACAUTO.pdf, componentlink2description="DigiKey Link", componentlink2url=https://www.digikey.com/en/products/detail/kemet/C0603C105K4RACAUTO/8635831, lastupdated="06/04/2026 19:23:53", Lifecycle Status=Active, Minimum Order=1, Mounting Type="Surface Mount, MLCC", packaging=TapeAndReel, Part Number=C0603C105K4RACAUTO, Part Status=Active, partid=2179, price=0.02, series="SMD Auto X7R", Size / Dimension="0.063\" L x 0.031\" W (1.60mm x 0.80mm)", Supplier 1=DigiKey, Thickness (Max)="0.037\" (0.95mm)"
C12: library part C0603C105K4RACAUTO, "CAP CER 1UF 16V X7R 0603", Device Package="0603 (1608 Metric)", manufacturer=KEMET, Operating Temperature="-55°C ~ 125°C", Ratings=AEC-Q200, Supplier Part Number 1=399-17704-1-ND, Temperature Coefficient=X7R, Tolerance=±10%, Voltage - Rated=16V, Applications="Automotive, Bypass, Decoupling", Capacitance="1 µF", componentlink1description=Datasheet, componentlink1url=https://api.kemet.com/component-edge/download/datasheet/C0603C105K4RACAUTO.pdf, componentlink2description="DigiKey Link", componentlink2url=https://www.digikey.com/en/products/detail/kemet/C0603C105K4RACAUTO/8635831, lastupdated="06/04/2026 19:23:53", Lifecycle Status=Active, Minimum Order=1, Mounting Type="Surface Mount, MLCC", Package / Case="0603 (1608 Metric)", packaging=TapeAndReel, Part Number=C0603C105K4RACAUTO, Part Status=Active, partid=2179, price=0.02, series="SMD Auto X7R", Size / Dimension="0.063\" L x 0.031\" W (1.60mm x 0.80mm)", Supplier 1=DigiKey, Thickness (Max)="0.037\" (0.95mm)"
C13: library part CS0603KRX7R7BB104, "CAP CER 0.1UF 16V X7R 0603", Device Package="0603 (1608 Metric)", manufacturer=Yageo, Operating Temperature="-55°C ~ 125°C", Supplier Part Number 1=311-3560-1-ND, Temperature Coefficient=X7R, Tolerance=±10%, Voltage - Rated=16V, Applications="Boardflex Sensitive", Capacitance="0.1 µF", componentlink1description=Datasheet, componentlink1url=http://www.yageo.com/NewPortal/yageodocoutput?fileName=/pdf/MLCC/UPY-ST_NPOX7R_16V-to-3KV_5.pdf, componentlink2description="DigiKey Link", componentlink2url=https://www.digikey.com/en/products/detail/yageo/CS0603KRX7R7BB104/6097897, Features="Soft Termination", lastupdated="06/04/2026 19:23:52", Lifecycle Status=Active, Minimum Order=1, Mounting Type="Surface Mount, MLCC", Package / Case="0603 (1608 Metric)", packaging=TapeAndReel, Part Number=CS0603KRX7R7BB104, Part Status=Active, partid=2286, price=0.02, series=CS, Size / Dimension="0.063\" L x 0.031\" W (1.60mm x 0.80mm)", Supplier 1=DigiKey, Thickness (Max)="0.037\" (0.95mm)"
D1: library part CMP-12225-000058-1, "TVS DIODE 5.25V 17V SOT666", Breakdown Voltage=6V, Capacitance=3.5pF, Case/Package=SOT-666, Clamping Voltage=17V, Leakage Current=150nA, Max Operating Temperature=125°C, Min Operating Temperature=-40°C, Operating Supply Voltage=5V, Package Quantity=1, Peak Pulse Current=5A, Power Line Protection=Yes, Test Current=1mA, Contact Plating=Tin, Depth=1.3mm, Direction=Unidirectional, Element Configuration=Dual, ESD Protection=Yes, Height=0.6mm, Lead Free="Lead Free", Length=1.7mm, Max Breakdown Voltage=6V, Max Reverse Leakage Current=150nA, Min Breakdown Voltage=6V, Mount="Surface Mount", Number of Bidirectional Channels=2, Number of Channels=2, Number of Elements=1, Number of Pins=6, packaging="Tape and Reel", Polarity=Unidirectional, Radiation Hardening=No, REACH SVHC="No SVHC", Reverse Breakdown Voltage=6V, Reverse Standoff Voltage=5V, Termination=SMD/SMT, Width=1.3mm, Working Voltage=5V
D2: "DIODE SCHOTTKY 100V 1A SOD123FL", Current - Average Rectified (Io)=1A, Current - Reverse Leakage @ Vr="40µA @ 100V", manufacturer="ON Semiconductor", Operating Temperature - Junction="-65°C ~ 175°C", Package / Case=SOD-123F, Supplier Device Package=SOD-123FL, Supplier Part Number 1=MBR1H100SFT3GOSCT-ND, Voltage - DC Reverse (Vr) (Max)=100V, Voltage - Forward (Vf) (Max) @ If="760mV @ 1A", componentlink1description=Datasheet, componentlink1url=http://www.onsemi.com/pub/Collateral/MBR1H100SF-D.PDF, componentlink2description="DigiKey Link", componentlink2url=http://digikey.com/product-detail/en/on-semiconductor/MBR1H100SFT3G/MBR1H100SFT3GOSCT-ND/3462287, Diode Type=Schottky, lastupdated="2026-04-05 8:31:56 PM", Lifecycle Status=Active, Minimum Order=1, Mounting Type="Surface Mount", packaging=TapeAndReel, Part Number=MBR1H100SFT3G, Part Status=Active, partid=2398, price=0.14, series=-, Speed="Fast Recovery =< 500ns, > 200mA (Io)", Supplier 1=DigiKey
D3: library part CMP-851-000001-3, "Neopixel Mini 3535 Rgb Leds W/ Integrated Driver Chip - White - Pack Of 10"
D4: library part SML-D12P8WT86, "LED GREEN DIFFUSED 0603 SMD", Current - Test=20mA, Device Package="0603 (1608 Metric)", Lens Color=White, manufacturer="Rohm Semiconductor", Millicandela Rating=6.3mcd, Supplier Device Package=1608, Supplier Part Number 1=511-1579-1-ND, Voltage - Forward (Vf) (Typ)=2.2V, Color=Green, componentlink1description=Datasheet, componentlink1url=https://www.rohm.com/datasheet/SML-D12V8W, componentlink2description="DigiKey Link", componentlink2url=https://www.digikey.com/en/products/detail/rohm-semiconductor/SML-D12P8WT86/1641798, Configuration=Standard, Height (Max)=0.65mm, lastupdated="2024-03-11 7:51:11 AM", Lens Size="1.20mm x 0.80mm", Lens Style="Rectangle with Flat Top", Lens Transparency=Diffused, Lifecycle Status=Active, Minimum Order=1, Mounting Type="Surface Mount", Package / Case="0603 (1608 Metric)", packaging=TapeAndReel, Part Number=SML-D12P8WT86, Part Status=Active, partid=616, price=0.03, series=EXCELED™, Size / Dimension="1.60mm L x 0.80mm W", Supplier 1=DigiKey, Wavelength - Dominant=560nm
D5: library part SML-511WWT86, "LED YELLOW DIFFUSED 0603 SMD", Current - Test=20mA, Device Package=0603, Lens Color=White, manufacturer="Rohm Semiconductor", Millicandela Rating=40mcd, Package / Case="0603 (1608 Metric)", Supplier Device Package="1608 (0603)", Supplier Part Number 1=511-1311-1-ND, Voltage - Forward (Vf) (Typ)=2V, Color=Yellow, componentlink1description=Datasheet, componentlink1url=https://media.digikey.com/pdf/Data%20Sheets/Rohm%20PDFs/SML-51_Series.pdf, componentlink2description="DigiKey Link", componentlink2url=https://www.digikey.com/en/products/detail/rohm-semiconductor/SML-511WWT86/637039, Configuration=Standard, Height (Max)=0.65mm, lastupdated="2024-03-11 7:53:23 AM", Lens Size="1.20mm x 0.80mm", Lens Style="Rectangle with Flat Top", Lens Transparency=Diffused, Lifecycle Status=Active, Minimum Order=1, Mounting Type="Surface Mount", packaging=TapeAndReel, Part Number=SML-511WWT86, Part Status=Active, partid=1184, price=0.10, series=-, Size / Dimension="1.60mm L x 0.80mm W", Supplier 1=DigiKey, Wavelength - Dominant=590nm
D6: library part SML-D12U1WT86, "LED RED DIFFUSED 1608 SMD", Current - Test=20mA, Device Package="0603 (1608 Metric)", Lens Color=White, manufacturer="Rohm Semiconductor", Millicandela Rating=63mcd, Supplier Device Package=1608, Supplier Part Number 1=SML-D12U1WT86CT-ND, Voltage - Forward (Vf) (Typ)=2.2V, Color=Red, componentlink1description=Datasheet, componentlink1url=https://www.rohm.com/datasheet/SML-D12U1W, componentlink2description="DigiKey Link", componentlink2url=https://www.digikey.com/en/products/detail/rohm-semiconductor/SML-D12U1WT86/5843853, Configuration=Standard, Height (Max)=0.65mm, lastupdated="2024-03-11 7:52:04 AM", Lens Size="1.20mm x 0.80mm", Lens Style="Rectangle with Flat Top", Lens Transparency=Diffused, Lifecycle Status=Active, Minimum Order=1, Mounting Type="Surface Mount", Package / Case="0603 (1608 Metric)", packaging=TapeAndReel, Part Number=SML-D12U1WT86, Part Status=Active, partid=452, price=0.02, series=SML-D12, Size / Dimension="1.60mm L x 0.80mm W", Supplier 1=DigiKey, Wavelength - Dominant=620nm
F1: library part CMP-005-000017-6, "PTC Resettable Fuse 1A(hold) 1.8A(trip) 6VDC 100A 0.6W 0.3s 0.55Ohm SMD Solder Pad 1206 T/R Automotive", Case Code (Imperial)=1206, Case Code (Metric)=3216, Hold Current=1A, Max Current Rating=100A, Max Operating Temperature=85°C, Maximum Resistance 1 Hour (R1max)=210mΩ, Min Operating Temperature=-40°C, Package="1206 Bel Fuse", Resistance=55mΩ, Trip Current=1.8A, Working Voltage=6V, Availability=Good, Case/Package=1206, Check_prices=https://www.snapeda.com/parts/0ZCJ0100FF2E/Bel%20Fuse%20Inc./view-part/970476/?ref=eda, China RoHS=Compliant, Component Type=Standard, Design Item ID=0ZCJ0100FF2E, DigiKey-Purchase-URL=https://snapeda.com/shop?store=DigiKey&id=970476, Height=1mm, Lead Free="Lead Free", Lifecycle Status=Production, MF="Bel Fuse", Mount="Surface Mount", Mouser-Purchase-URL=https://snapeda.com/shop?store=Mouser&id=970476, MP=0ZCJ0100FF2E, Number of Terminals=2, packaging="Tape & Reel (TR)", Pin Count=2, price=None, REACH SVHC=Yes, RoHS=Compliant, SnapEDA_Link=https://www.snapeda.com/parts/0ZCJ0100FF2E/Bel%20Fuse%20Inc./view-part/970476/?ref=snap, Source=0ZCJ0100FF2E.SchLib, Time to Trip=300ms, Width=1.8mm
IC1: "MOSFET P-CH 20V 4A SOT23-3", Current - Continuous Drain (Id) @ 25°C="4A (Ta)", Drain to Source Voltage (Vdss)="20 V", Drive Voltage (Max Rds On,  Min Rds On)="1.8V, 4.5V", Input Capacitance (Ciss) (Max) @ Vds="294 pF @ 10 V", manufacturer="Diodes Incorporated", Operating Temperature="-55°C ~ 150°C (TJ)", Package / Case="TO-236-3, SC-59, SOT-23-3", Power Dissipation (Max)="900mW (Ta)", Supplier Device Package=SOT-23-3, Supplier Part Number 1=DMG3415UDICT-ND, componentlink1description=Datasheet, componentlink1url=//media.digikey.com/pdf/Data%20Sheets/Diodes%20PDFs/DMG3415U.pdf, componentlink2description="DigiKey Link", componentlink2url=https://www.digikey.com/en/products/detail/diodes-incorporated/DMG3415U-7/2052768, FET Type=P-Channel, Gate Charge (Qg) (Max) @ Vgs="9.1 nC @ 4.5 V", lastupdated="2026-04-05 8:53:25 PM", Lifecycle Status=Active, Minimum Order=1, Mounting Type="Surface Mount", packaging=TapeAndReel, Part Number=DMG3415U-7, Part Status=Active, price=0.07, Rds On (Max) @ Id, Vgs="39mOhm @ 4A, 4.5V", series=-, Supplier 1=DigiKey, Technology="MOSFET (Metal Oxide)", Vgs (Max)=±8V, Vgs(th) (Max) @ Id="1V @ 250µA"
J1: library part CMP-19038-000003-1, "CONN RCP USB2.0 TYP C 24P SMD RA"
J2: "Digital Relative Humidity Temperature Sensor, Â±1.8 / max 2.5 %RH, Â±0.2 Â°C, Ultra-Low-Power, with filtermembrane", Package=Package, Availability="In Stock", Check_prices=https://www.snapeda.com/parts/SHT41-AD1B-R2/Sensirion/view-part/?ref=eda, MF=Sensirion, MP=SHT41-AD1B-R2, price=None, Purchase-URL=https://pricing.snapeda.com/search/part/SHT41-AD1B-R2/?ref=eda, SnapEDA_Link=https://www.snapeda.com/parts/SHT41-AD1B-R2/Sensirion/view-part/?ref=snap
J3: library part CMP-005-000001-1, "CON - Header 1x3 pins-100Mils - TH", Package=TH, Assembly Type=TH, Component Type=Standard, Design Item ID=CON_HDR_1X3, Pin Count=3, Polarized=No, Source=CEGEP_SHERBROOKE_TGE_LIBRARY.SchLib
J4: library part CMP-005-000008-4, "Connector Header Through Hole 2 position 0.079 (2.00mm)", Package=None, Check_prices=https://www.snapeda.com/parts/B2B-PH-K-S/JST/view-part/?ref=eda, Component Type=Standard, Design Item ID=B2B-PH-K-S, MF="JST Sales America Inc.", MP=B2B-PH-K-S, Pin Count=2, SnapEDA_Link=https://www.snapeda.com/parts/B2B-PH-K-S/JST/view-part/?ref=snap, Source=B2B-PH-K-S.SchLib
MTH1: library part CMP-006-000008-2, "MTH - MOUNTING HOLE M3 PLATED - M3", Package=M3, Assembly Type=NONE, Component Type="Standard (No BOM)", Design Item ID=MTH_M3, HelpURL=https://littlemachineshop.com/images/gallery/PDF/TapDrillSizes.pdf, Pin Count=1, Source=CEGEP_SHERBROOKE_TGE_LIBRARY.SchLib
MTH2: library part CMP-006-000010-2, "MTH - MOUNTING HOLE M3 NON-PLATED - M3", Package=M3, Assembly Type=NONE, Component Type="Standard (No BOM)", Design Item ID=MTH_M3_NON_PLATED, HelpURL=https://littlemachineshop.com/images/gallery/PDF/TapDrillSizes.pdf, Pin Count=0, Source=CEGEP_SHERBROOKE_TGE_LIBRARY.SchLib
R1 R2 R3 R4 R13 R14 R16 R17: library part ERJ-UP3J151V, "RES 150 OHM 5% 1/4W 0603", Device Package="0603 (1608 Metric)", manufacturer="Panasonic Electronic Components", Operating Temperature="-55°C ~ 155°C", Power (Watts)="0.25W, 1/4W", Ratings=AEC-Q200, Supplier Device Package=0603, Supplier Part Number 1=10-ERJ-UP3J151VCT-ND, Temperature Coefficient=±200ppm/°C, Tolerance=±5%, componentlink1description=Datasheet, componentlink1url=https://b2b-api.panasonic.eu/file_stream/pids/fileversion/4484, componentlink2description="DigiKey Link", componentlink2url=https://www.digikey.com/en/products/detail/panasonic-electronic-components/ERJ-UP3J151V/12092481, Composition="Thick Film", Features="Anti-Sulfur, Automotive AEC-Q200, Pulse Withstanding", Height - Seated (Max)="0.022\" (0.55mm)", Lifecycle Status=Active, Minimum Order=1, Number of Terminations=2, Package / Case="0603 (1608 Metric)", packaging=TapeAndReel, Part Number=ERJ-UP3J151V, Part Status=Active, partid=63618, price=0.02, series=ERJ-UP3, Size / Dimension="0.063\" L x 0.031\" W (1.60mm x 0.80mm)", Supplier 1=DigiKey
  R1 R2: lastupdated="2024-02-09 8:41:36 PM", Resistance="5.1k Ohms"
  R3: lastupdated="2024-02-09 8:41:36 PM", Resistance="0 Ohms"
  R4: lastupdated="09/02/2024 20:41:36", Resistance="100K Ohms"
  R13 R14 R16: lastupdated="2024-02-09 8:41:36 PM", Resistance="470 Ohms"
  R17: lastupdated="2024-02-09 8:41:36 PM", Resistance="150 Ohms"
R5 R6 R7 R11 R12 R15 R18: library part ERJ-UP3J151V, "RES 150 OHM 5% 1/4W 0603", Device Package="0603 (1608 Metric)", manufacturer="Panasonic Electronic Components", Operating Temperature="-55°C ~ 155°C", Power (Watts)="0.25W, 1/4W", Ratings=AEC-Q200, Resistance="150 Ohms", Supplier Device Package=0603, Supplier Part Number 1=10-ERJ-UP3J151VCT-ND, Temperature Coefficient=±200ppm/°C, Tolerance=±5%, componentlink1description=Datasheet, componentlink1url=https://b2b-api.panasonic.eu/file_stream/pids/fileversion/4484, componentlink2description="DigiKey Link", componentlink2url=https://www.digikey.com/en/products/detail/panasonic-electronic-components/ERJ-UP3J151V/12092481, Composition="Thick Film", Features="Anti-Sulfur, Automotive AEC-Q200, Pulse Withstanding", Height - Seated (Max)="0.022\" (0.55mm)", lastupdated="2024-02-09 8:41:36 PM", Lifecycle Status=Active, Minimum Order=1, Number of Terminations=2, Package / Case="0603 (1608 Metric)", packaging=TapeAndReel, Part Number=ERJ-UP3J151V, Part Status=Active, partid=63618, price=0.02, series=ERJ-UP3, Size / Dimension="0.063\" L x 0.031\" W (1.60mm x 0.80mm)", Supplier 1=DigiKey
R8 R9 R10: library part ERJ-UP3J151V, "RES 150 OHM 5% 1/4W 0603", Device Package="0603 (1608 Metric)", manufacturer="Panasonic Electronic Components", Operating Temperature="-55°C ~ 155°C", Power (Watts)="0.25W, 1/4W", Ratings=AEC-Q200, Resistance="5.1k Ohms", Supplier Device Package=0603, Supplier Part Number 1=10-ERJ-UP3J151VCT-ND, Temperature Coefficient=±200ppm/°C, Tolerance=±5%, componentlink1description=Datasheet, componentlink1url=https://b2b-api.panasonic.eu/file_stream/pids/fileversion/4484, componentlink2description="DigiKey Link", componentlink2url=https://www.digikey.com/en/products/detail/panasonic-electronic-components/ERJ-UP3J151V/12092481, Composition="Thick Film", Features="Anti-Sulfur, Automotive AEC-Q200, Pulse Withstanding", Height - Seated (Max)="0.022\" (0.55mm)", lastupdated="2024-02-09 8:41:36 PM", Lifecycle Status=Active, Minimum Order=1, Number of Terminations=2, Package / Case="0603 (1608 Metric)", packaging=TapeAndReel, Part Number=ERJ-UP3J151V, Part Status=Active, partid=63618, price=0.02, series=ERJ-UP3, Size / Dimension="0.063\" L x 0.031\" W (1.60mm x 0.80mm)", Supplier 1=DigiKey
REV1: library part REV_REVISION_CARTRIDGE_MINI, "REV - REVISION CARTRIDGE MINI", Assembly Type=NONE, Rule="Component Clearance Constraint [Horizontal Clearance = 0mil    Vertical Clearance = 0mil]"
S1 S2: "SWITCH TACTILE SPST-NO 0.02A 15V", Part Number=EVQ-P2202M
SER1: library part SER_SERIAL_CARTRIDGE_MICRO, "SER - SERIAL CARTRIDGE MICRO", Assembly Type=NONE, Rule="Component Clearance Constraint [Horizontal Clearance = 0mil    Vertical Clearance = 0mil]"
U1: Package=None, Availability=Unavailable, MF="{'manufacturer': u'Espressif Systems'}", MP=ESP32-C3-MINI-1-N4, price=None
U2: "Optical Sensor Ambient - IÂ²C 4-SMD, J-Lead", Package="SMD-4 Vishay Semiconductor", Check_prices=https://www.snapeda.com/parts/VEML7700-TT/Vishay/view-part/?ref=eda, MF="Vishay Semiconductor", MP=VEML7700-TT, SnapEDA_Link=https://www.snapeda.com/parts/VEML7700-TT/Vishay/view-part/?ref=snap
U3: "Air Quality, Carbon Dioxide (CO2), Metal Oxide (MOX) Sensor IÂ²C, SPI", Package="LGA-9 ScioSense", Check_prices=https://www.snapeda.com/parts/ENS160-BGLM/ScioSense/view-part/?ref=eda, MF=ScioSense, MP=ENS160-BGLM, SnapEDA_Link=https://www.snapeda.com/parts/ENS160-BGLM/ScioSense/view-part/?ref=snap
U4: library part CMP-04917-000099-1, "IC REG LINEAR 3.3V 500MA 6SON", Dropout Voltage=950mV, Max Operating Temperature=125°C, Min Operating Temperature=-40°C, Output Current=500mA, Output Voltage=3.3V, Quiescent Current=30uA, Lead Free="Lead Free", Mount="Surface Mount", Number of Pins=6, Number of Regulators=1, packaging="Tape and Reel", RoHS Compliant=Yes
U5: library part CMP-0133-00054-1, "Stand-Alone Linear Li-Ion/Li-Polymer Charge Management Controller with Power-Good Output, 4.2V, 10-Pin DFN, Industrial Temperature, Tape and Reel", DatasheetVersion="revB, May-2009", PackageDescription="10-Lead Plastic Dual Flat, No Lead Package (MF) - 3x3x0.9mm Body [DFN]", PackageReference=DFN-MF10, PackageVersion="revBB, Aug-2009"
U6: library part CMP-0062-01644-4, "800mA Low-Dropout Linear Regulator, 4-pin SOT-223, Pb-Free", manufacturer="Texas Instruments", PackageTopMarking=XYTT*N03A, PowerWise=N, Code_IPC=SOT223-4, Code_JEDEC=TO-261-AA, componentlink1description="Datasheet URL", componentlink1url=http://www.ti.com/general/docs/lit/getliterature.tsp?genericPartNumber=LM1117-N&fileType=pdf, CompType="LDO IC", High-Reliability=Y, PackageDescription="Molded SOT-223, 6.50 x 3.56 x 1.6mm Body, 4 Lead, 2.3mm Pitch", PackageReference=DCY0004A, PartNumber=LM1117MPX-ADJ/NOPB, PinCount=4, RoHS=Y

## Via types
v1: diameter 0.5, hole 0.3, Top to Bottom, tented both sides, 69 vias
v2: diameter 0.5, hole 0.3, Top to Bottom, tented top, 4 vias

## Nets (pads, with @x,y where several pads share a name; then routed paths per layer and width w, separated by ;. In a path a pad name is that pad's centre, name@x,y a point inside that pad or via, vN(x,y) a via of type N, cw(c..) or ccw(c..) an arc to the next point about the centre after c; other vN are vias at no path point)
1V8: C9.2 C14.2 R17.1 U3.4 U6.2 U6.4 | length 26.9
  Top w0.152: U3.4@16.176,13.801 v1(17.101,13.801)
  Bottom w0.152: C9.2 15.355,12.945 15.355,12.404 15.611,12.149 16.829,12.149 17.473,12.793 17.473,13.274 17.101,13.646 v1(17.101,13.801) 20.175,16.875 U6.2 C14.2 20.046,19.3 19.541,18.796 17.496,18.796 R17.1
  Bottom w0.5: U6.4 20.75,13.225 22.275,14.75 22.275,15.35 U6.2
3V3: 3V3.1 C3.2 C4.2 C6.2 C12.2 C13.2 J2.3 R5.1 R6.1 R7.1 R8.2 R9.2 R10.2 R11.1 U1.3 U3.5 U3.7 U4.1 U6.3 | length 28
  Top w0.152: U4.1 5.225,20.35 C12.2@5.25,20.325 ; C12.2 5.65,20.325 6.725,19.25 v1(6.75,19.25) ; v1(9.998,18.5) 10.064,18.433 10.064,18.336 10.55,17.85 J2.3 ; C6.2 10.575,15.378 v1(10.603,15.35) ; U3.7 14.075,15.4 14.325,15.65 v1(14.373,15.602) ; R8.2 14.275,17.075 15.099,17.899 15.099,18.332 v1(15.144,18.378) ; R9.2 16.175,16.922 U3.5 16.75,14.85 v1(17.05,15.15) ; R7.1 18.15,7.57 v1(18.8,6.92) ; v1@22.75,30.48 v1(22.805,30.535)
  Top w0.26: R10.2 6.59,28.65 v1(6.576,28.636)
  Top w0.5: U1.3 8.002,27.902 v1(8.65,27.902)
  Bottom w0.127: R11.1 6.206,22.5 v1(6.576,22.87) ; C3.2 9.625,27.85 10.925,26.55 R6.1 ; C13.2 U6.3 v1(24.438,16.875)
  Bottom w0.152: v1(10.316,22.516) 10.925,23.125 R5.1 ; v1(22.805,30.535) 3V3.1
  Bottom w0.5: C4.2 8.05,28.925 8.25,28.725 8.25,28.303 8.653,27.9 C3.2
D_N: D1.4 U1.26 | length 17.1
  Top w0.152: D1.4 13.95,9.65 14.024,9.724 14.404,9.724 16.45,11.769 17.811,11.769 20.121,14.08 20.121,15.471 20.5,15.85 20.5,16.2 20.5,16.219 20.5,21.791 19.991,22.3 U1.26
D_P: D1.6 U1.27 | length 18.2
  Top w0.152: D1.6 13.024,9.379 13.024,9.706 12.87,9.86 12.87,10.34 13.245,10.715 14.749,10.715 15.78,11.746 16.031,11.746 16.334,12.049 16.729,12.049 17.681,13.001 17.681,18.59 19.176,20.086 19.176,21.114 19.124,21.167 19.124,22.614 19.609,23.1 U1.27
ENS_INT: U1.18 U3.6 | length 6.8
  Top w0.152: v1(13.245,19.65) 13.311,19.716 13.311,19.811 13.9,20.4 U1.18 ; v1(15.102,15.852) 15.102,14.873 U3.6
  Bottom w0.152: v1(13.245,19.65) 14.207,18.688 14.207,18.494 15.102,17.599 v1(15.102,15.852)
GND: C1.1 C2.1 C3.1 C4.1 C5.1 C6.1 C7.1 C8.1 C9.1 C10.1 C11.1 C12.1 C13.1 C14.1 D1.2 D3.2 J1.A1/B12 J1.A12/B1 J2.4 J3.1 J4.2 MTH1.1 R1.2 R2.2 R3.2 R4.1 R12.2 R15.1 R18.2 S1.1 S1.2 S2.1 S2.2 U1.1 U1.2 U1.11 U1.14 U1.36 U1.37 U1.38 U1.39 U1.40 U1.41 U1.42 U1.43 U1.44 U1.45 U1.46 U1.47 U1.48 U1.49_1 U1.49_2 U1.49_3 U1.49_4 U1.49_5 U1.49_6 U1.49_7 U1.49_8 U1.49_9 U1.50 U1.51 U1.52 U1.53 U2.3 U3.3 U3.8 U3.9 U4.5 U4.7 U5.5 U5.11 | length 115.1
  Top w0.127: v1(2,26.3) 2.51,26.81 U2.3 ; C10.1@3.175,11.35 3.175,11.4 3.562,11.786 4.289,11.786 v1(4.302,11.8) ; v1(19.601,19.676) 19.601,20.292 19.596,20.296 U1.51
  Top w0.152: U5.5 1.5,8.949 2.199,8.25 U5.11 ; U4.5 U4.7 2.924,20.576 2.924,19.576 2.925,19.574 C11.1 3.125,18.3 4.575,18.3 4.826,18.551 4.961,18.686 5.176,18.686 5.25,18.76 C12.1@5.25,18.975 ; C12.1 5.625,18.95 v1(5.625,17.95) ; v1(7.05,21.791) 7.341,21.5 U1.11 ; C2.1 v1(9.85,9.425) C1.1 ; C6.1 9.25,16.3 v1(9.25,15.35) ; J1.A1/B12 J1.A1/B12@10.2,5.9 ; J2.4 10.65,19.85 v1(10.7,19.9) U1.14 ; v1(13.245,13.801) U3.8 ; D1.2 13.426,7.671 13.451,7.646 v1(13.451,6.825) ; J1.A12/B1@16.175,5.925 J1.A12/B1 ; U3.3 16.458,13.033 v1(16.893,13.033) ; J3.1@22.114,23.616 22.125,23.605 J3.1@22.125,23.556
  Top w0.254: U3.8 U3.9
  Top w0.26: J1.A1/B12@10.2,5.9 v1(10.2,6.775) ; J1.A12/B1@16.175,5.925 v1(16.175,6.775)
  Top w0.5: v1(6.828,30.475) 6.853,30.45 U1.53 7.95,29.55 U1.1 U1.2 9.378,28.7 10.603,27.475 U1.49_1 ; U1.52 U1.11@7.95,21.45 ; U1.53@8,30.4 U1.48 U1.47 U1.46 U1.45 U1.44 U1.43 U1.42 U1.41 U1.40 U1.39 U1.38 U1.37 U1.36 19.8,30.4 U1.50 19.85,30.698 20.667,30.698 20.902,30.933 20.902,34.083 D3.2 ; U1.49_5 U1.49_6 U1.49_7 U1.49_8 ; J3.1@22.8,23.545 23.65,22.695 S1.1 S1.2 S2.1 S2.2 ; U1.49_8 U1.49_1 ; U1.49_8 U1.49_9 U1.49_4 U1.49_3 U1.49_2 U1.49_1
  Bottom w0.127: C5.1 1.55,25.85 v1(2,26.3) 2.101,26.3 2.251,26.45 C8.1 C7.1 ; R12.2 R15.1 6.85,7.85 7.783,6.917 v1(7.8,6.917) ; v1(13.976,11.481) 13.976,11.582 14.2,11.806 C9.1 ; R1.2 R2.2 ; v1(19.601,19.676) 19.672,19.747 19.797,19.747 20.7,20.65 C14.1
  Bottom w0.152: C4.1@7.8,30.475 8.374,29.901 9.024,29.901 10.975,27.95 C3.1 ; R3.2 13.451,2.501 13.451,2.849 13.789,2.849 13.951,3.011 13.951,4.251 13.451,4.752 v1(13.451,6.825) ; v1(13.451,6.825) R4.1 ; R1.2 15.7,10.125 v1(15.975,10.4) ; R18.2 16.383,13.033 v1(16.893,13.033)
  Bottom w0.5: v1(6.828,30.475) C4.1@7.8,30.475 ; C14.1 C13.1
  other v2: 2.5,7.75 1.55,8.25 3.45,8.25 2.5,8.75
I2C.SCL: J2.2 J3.3 R8.1 U1.19 U2.1 U3.2 | length 45.3
  Top w0.127: U2.1 7.082,20.409 7.082,19.72 7.318,19.485 7.318,19.415 8.882,17.85 J2.2 9.877,17.85 10.291,17.436 12.951,17.436 13.133,17.255 ; R8.1 14.225,17.763 13.641,17.763 13.133,17.255 ; U3.2 14.763,13.111 14.763,12.123 14.689,12.049 13.002,12.049 12.046,13.005 12.046,15.683 13.133,16.769 13.133,17.255
  Top w0.152: R8.1 v1(14.225,19.65) 14.292,19.716 14.292,19.992 14.7,20.4 U1.19
  Bottom w0.152: v1(14.225,19.65) 14.292,19.716 14.65,19.716 14.705,19.772 14.858,19.772 15.329,19.3 18.059,19.3 20.136,21.376 23.125,21.376 24.248,22.499 24.248,27.177 J3.3@22.8,28.625
I2C.SDA: J2.1 J3.2 R9.1 U1.20 U2.4 U3.1 | length 44.4
  Top w0.127: U2.4 3.474,28.08 4.285,27.269 4.285,23.566 7.336,20.514 7.336,20.091 8.777,18.65 J2.1 ; U3.1 13.714,13.111 13.639,13.111 12.922,13.112 12.3,13.733 12.3,14.798 13.889,16.386 14.809,16.386 14.963,16.541 14.963,17.317 R9.1
  Top w0.152: J2.1 v1(9.85,19.25) ; U1.20 15.525,20.575 15.525,19.925 v1(15.55,19.9) 15.55,19.806 15.623,19.733 15.623,18.724 15.972,18.375 R9.1
  Bottom w0.152: v1(9.85,19.25) 11.229,19.25 12.362,20.383 15.051,20.383 15.534,19.9 v1(15.55,19.9) 17.306,21.656 23.009,21.656 23.968,22.615 23.968,24.917 J3.2@22.8,26.085
LOAD: C5.2 C11.2 D3.4 F1.1 LD.1 U4.4 U4.6 | length 17.4
  Top w0.152: U4.4 1.522,22.096 1.552,22.126 1.942,22.516 2.115,22.516 2.374,22.775 v1(2.468,22.775) ; D3.4 23.651,31.772 23.651,33.629 24.316,34.294 24.316,35.816 23.996,36.136 v1(23.996,36.173)
  Top w0.26: U4.6 1.516,20.356 1.158,20.356 0.914,20.6 0.914,21.367 1.197,21.65 U4.4 ; C11.2 U4.6@1.575,20.297
  Bottom w0.152: C5.2 C5.2@1.645,22.775 ; LD.1 23.984,36.173 v1(23.996,36.173)
  Bottom w0.5: C5.2@1.645,22.775 v1(2.468,22.775) 2.468,22.357 2.55,22.275 F1.1
NEOIN: D3.3 U1.6 | length 18.1
  Top w0.152: U1.6 8.776,25.5 9.005,25.271 v1(9.005,24.923) ; v1(21.101,30.051) 21.122,30.072 21.747,30.072 21.86,30.185 D3.3
  Bottom w0.152: v1(9.005,24.923) 15.738,24.923 20.866,30.051 v1(21.101,30.051)
NetC7_2: C7.2 C8.2 R10.1 U2.2 | length 12.4
  Top w0.127: v1(1.15,26.275) 1.885,25.54 U2.2 ; R10.1 v1(6.45,27.35)
  Bottom w0.127: v1(1.15,26.275) 2.225,27.35 v1(6.45,27.35)
  Bottom w0.152: C7.2 C8.2 6.383,27.35 v1(6.45,27.35)
NetD1_1: D1.1 J1.A6 J1.B6 | length 2.5
  Top w0.26: D1.1 12.792,7.537 12.792,6.56 12.95,6.402 J1.A6 J1.B6
NetD1_3: D1.3 J1.A7 J1.B7 | length 4.9
  Top w0.26: J1.B7 12.45,5.198 12.678,4.97 13.798,4.97 13.95,5.122 J1.A7 13.95,6.402 14.085,6.536 14.085,7.56 D1.3
NetD2_2: D2.2 F1.2 IC1.3 | length 5.4
  Bottom w0.152: IC1.3 F1.2 4.133,15.495 4.748,14.88 D2.2
NetD4_2: D4.2 R16.2 | length 2.4
  Top w0.152: D4.2 6.05,3.55 v1(6.75,3.55)
  Bottom w0.152: R16.2 v1(6.75,3.55)
NetD5_2: D5.2 R14.2 | length 2
  Top w0.152: D5.2 5.6,6.6 v1(6.75,6.6)
  Bottom w0.152: R14.2 v1(6.75,6.6)
NetD6_2: D6.2 R13.2 | length 4.4
  Top w0.152: D6.2 v1(6.375,10.875)
  Bottom w0.152: v1(6.375,10.875) 7.355,10.875 8.83,9.4 R13.2
NetJ1_1: J1.1 J1.2 J1.3 J1.4 J1.5 J1.6 R3.1 | length 24.6
  Top w0.152: J1.3 J1.4 J1.5
  Bottom w0.152: J1.1 J1.3 8.88,1.549 12.05,1.549 ; R3.1 12.05,2.4 12.05,1.549 ; J1.2 J1.6 17.469,1.549 12.05,1.549
NetJ1_A5: J1.A5 R1.1 | length 6.4
  Top w0.152: J1.A5 11.539,5.889 11.539,7.319 12.719,8.5 v1(14.565,8.5)
  Bottom w0.152: v1(14.565,8.5) 14.965,8.1 R1.1
NetJ1_B5: J1.B5 R2.1 | length 4.5
  Top w0.152: J1.B5 14.539,5.889 14.539,6.555 v1(14.809,6.825)
  Bottom w0.152: v1(14.809,6.825) 15.383,7.399 16.289,7.399 16.991,8.1 R2.1
NetR5_2: R5.2 RST.1 S1.3 S1.4 U1.8 | length 29.5
  Top w0.26: U1.8 8.006,23.894 8.725,23.894 v1(8.731,23.888) ; v1(18.8,14.6) 18.8,14.665 19,14.865 RST.1 ; v1(20.85,14.599) 21.134,14.599 S1.4 21.95,21.68 21.218,22.412 21.004,22.412 v1(20.958,22.458)
  Bottom w0.26: v1(8.731,23.888) 9.588,23.888 9.6,23.9 9.682,23.818 9.682,22.254 10.054,21.882 15.185,21.882 15.762,22.458 v1(20.958,22.458) ; v1(18.8,14.6) v1@20.849,14.599
NetR6_2: R6.2 U1.5 U1.22 | length 15.5
  Top w0.26: U1.5 8.07,26.37 8.361,26.37 8.744,26.753 v1(8.809,26.753) 9.682,25.88 9.682,22.254 10.145,21.791 16.489,21.791 17.1,21.18 U1.22
  Bottom w0.26: v1(8.809,26.753) 8.809,26.741 9.625,25.925 R6.2